# Altium PCB MainBoardPCB_PWR.PcbDoc (part 13 of 29)
Units mm, origin at the board's own origin, x right, y up, seen from the top; angles counter-clockwise.
Board outline 333.63 x 349.38 mm, 16 copper layers (L1, L2 (GND), L3 (Sign), L4 (GND), L5 (Sign), L6 (PWR/GND), L7(PWR/GND), L8 (PWR/GND), L9 (PWR/GND), L10 (PWR/GND), L11 (PWR/GND), L12 (Sign), L13 (GND), L14 (Sign), L15 (GND), L16), stack 2.503 mm thick; 2187 components, 1615 nets, 7987 pads, 1695 vias.
Unrouted connection lines stored in the file: 4757.
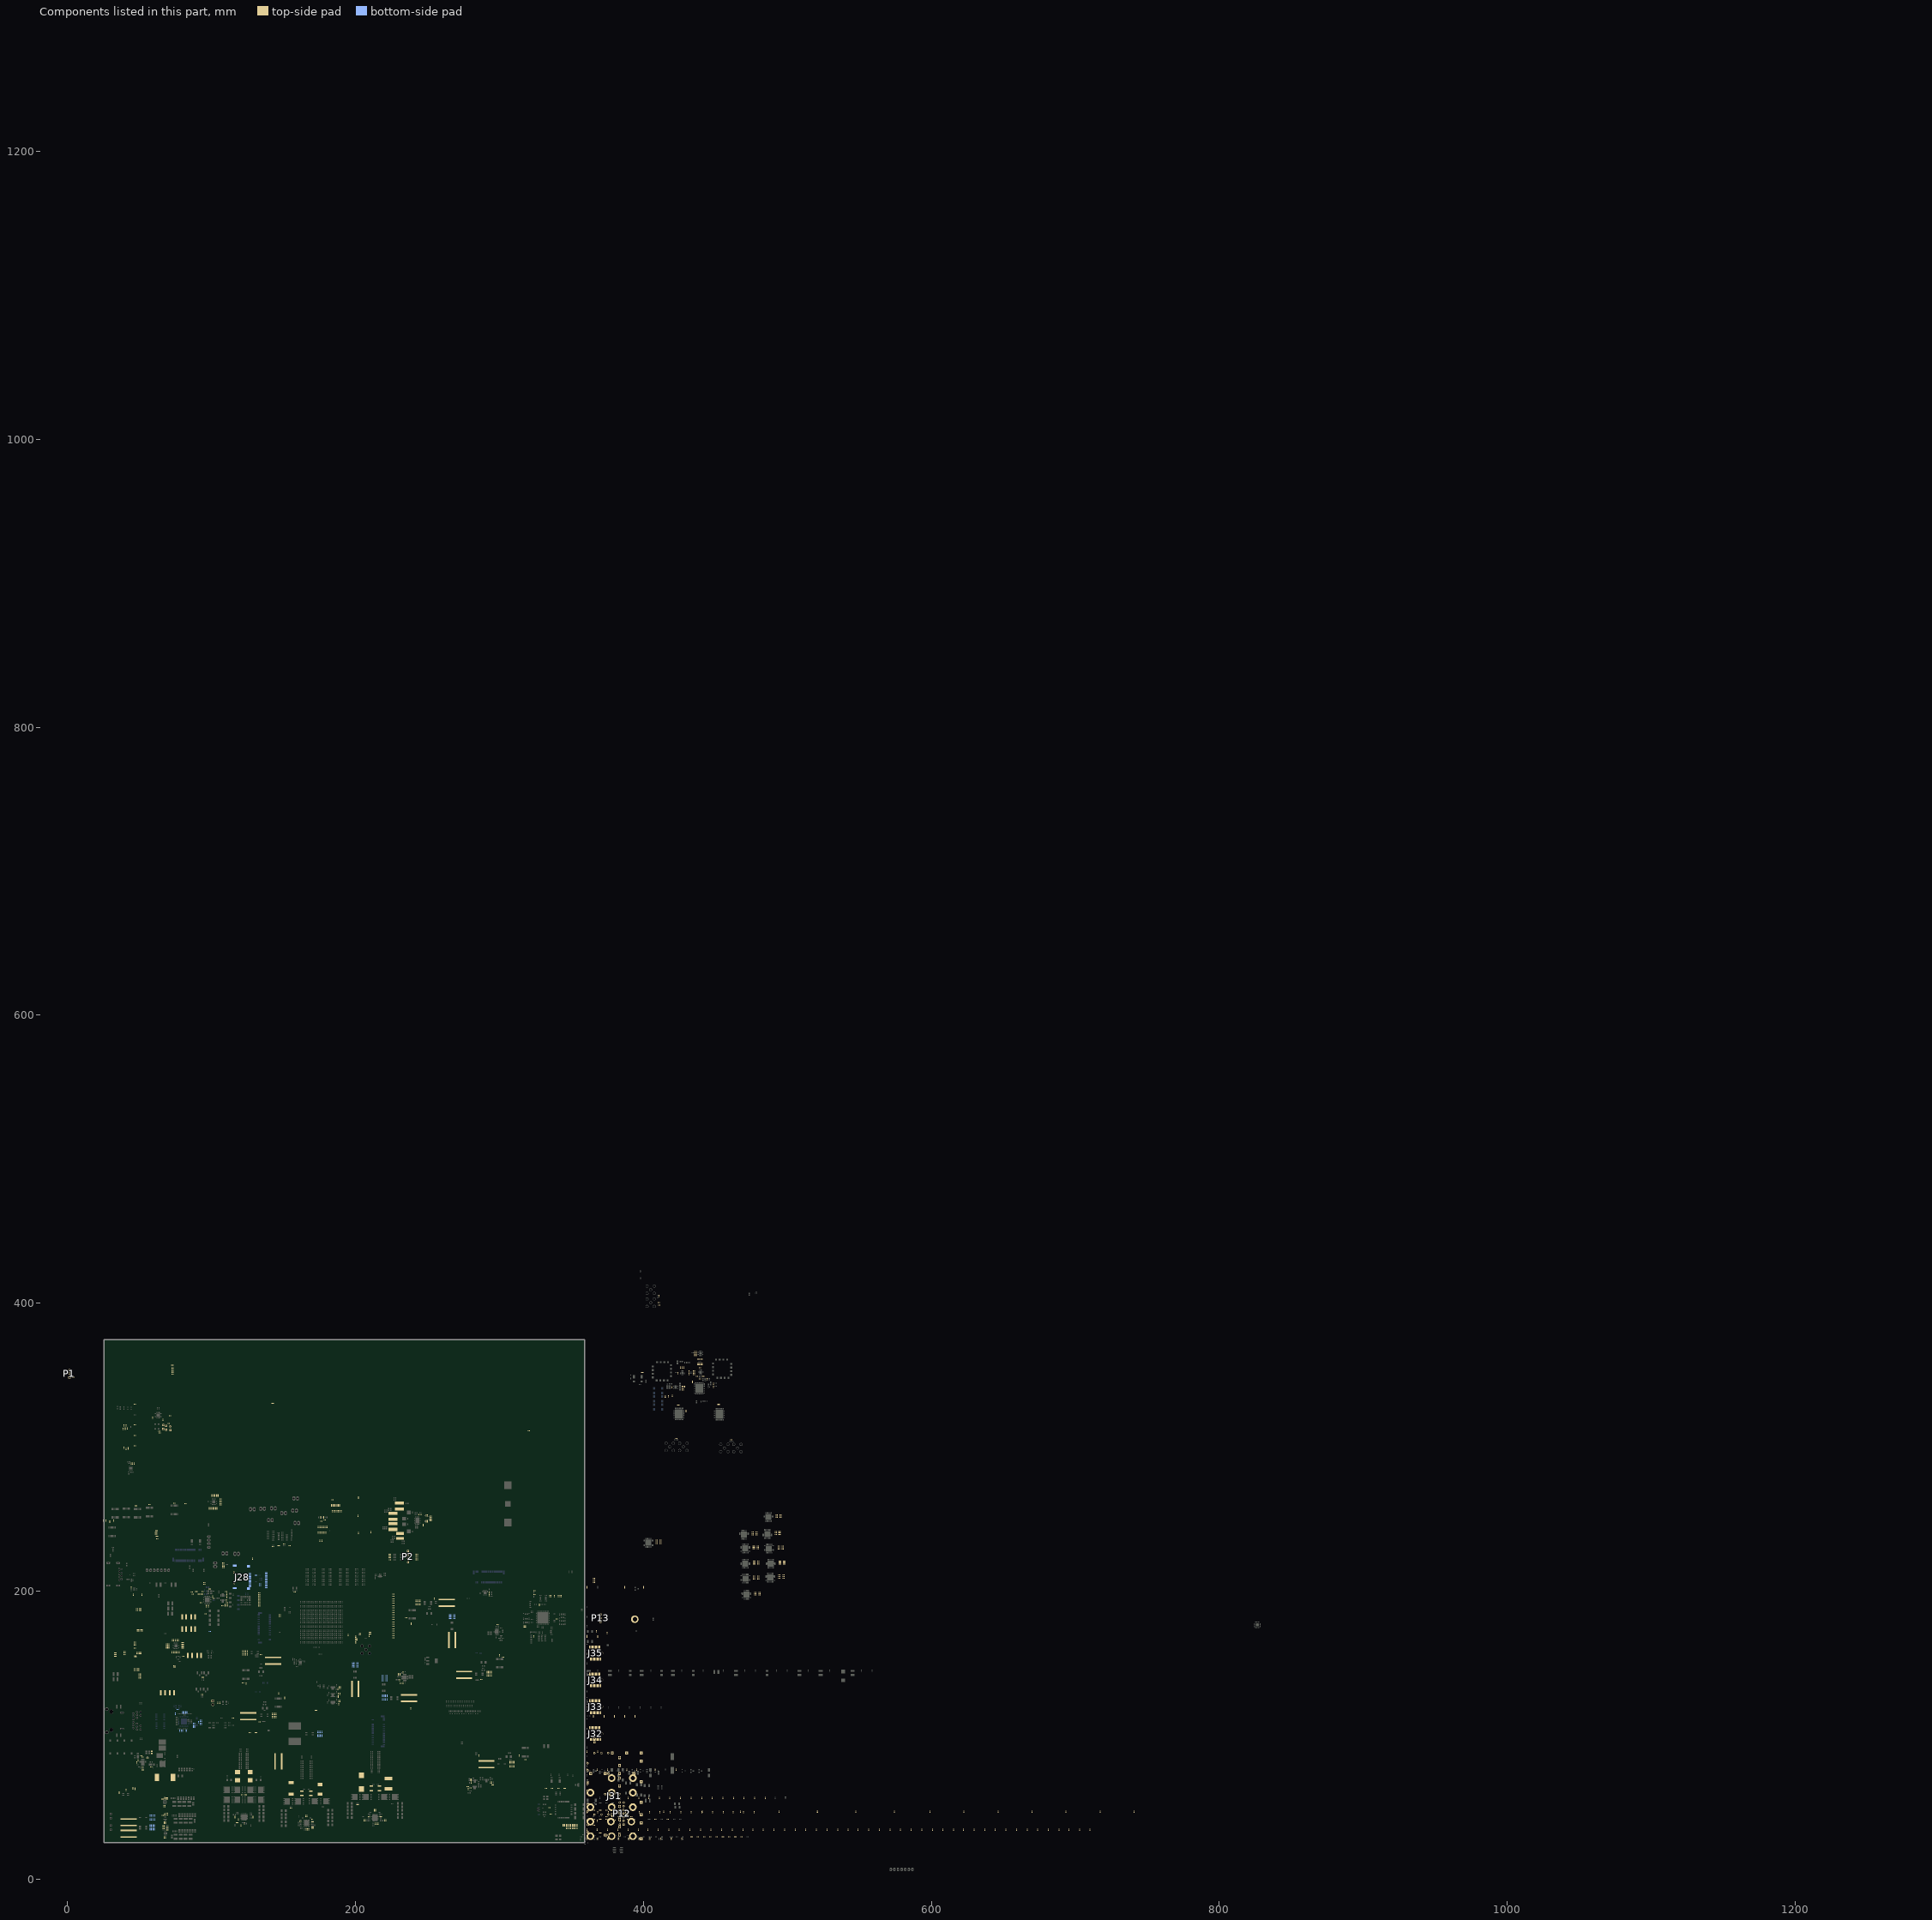
[diagram p15: the components of this part, seen from the top]

## Part data (continued)
J28: "WR-CRD Micro SD Card Connector Push & Push", Contact Resistance=100mOhm, Operating Temperature="-40 to +85degC", Rated Current=0.5A, Withstanding Voltage=500VAC, Working Voltage=30VAC, ComponentLink1Description=Manufacturer, ComponentLink1URL=http://www.we-online.de, ComponentLink2Description=Datasheet, ComponentLink2URL=https://katalog.we-online.com/em/datasheet/693071020811.pdf, Gender=Socket, Mounting Technology=SMT, Packaging="Tape and Reel", Part Number=693071020811, Pin Number=8, Published Date="November 2019", Publisher="Wurth Elektronik", Type="Push & Push"
J31: library part 2007132, Flammability Rating="UL94 V-0", Manufacturer="TE Connectivity", Manufacturer Part Number=2007132-1, Package Quantity=16, Supplier Part Number 1=A97939-ND, ComponentLink1Description=https://datasheet.ciiva.com/8074/1702641-8074723.pdf?src-supplier=Element14, ComponentLink1URL=https://datasheet.ciiva.com/8074/1702641-8074723.pdf?src-supplier=Element14, ComponentLink2Description=https://datasheet.ciiva.com/16354/2007132-1-16354359.pdf?src-supplier=Future+Electronics, ComponentLink2URL=https://datasheet.ciiva.com/16354/2007132-1-16354359.pdf?src-supplier=Future+Electronics, ComponentLink3Description=https://datasheet.ciiva.com/1447/1744756-1447853.pdf?src-supplier=Newark, ComponentLink3URL=https://datasheet.ciiva.com/1447/1744756-1447853.pdf?src-supplier=Newark, ComponentLink4Description=https://datasheet.ciiva.com/689/eng-cd-2007132-d1-pdf-2007132-c-drw-689518.pdf?src-supplier=Digi-Key, ComponentLink4URL=https://datasheet.ciiva.com/689/eng-cd-2007132-d1-pdf-2007132-c-drw-689518.pdf?src-supplier=Digi-Key, ComponentLink5Description=https://datasheet.ciiva.com/3093/eng-cs-1773408-1-pluggable-ixo-solutions-sfp2b-0209-3093041.pdf?src-supplier=Avnet, ComponentLink5URL=https://datasheet.ciiva.com/3093/eng-cs-1773408-1-pluggable-ixo-solutions-sfp2b-0209-3093041.pdf?src-supplier=Avnet, ComponentLink6Description=https://datasheet.ciiva.com/30089/o-solut-30089223.pdf?src-supplier=Onlinecomponents.com, ComponentLink6URL=https://datasheet.ciiva.com/30089/o-solut-30089223.pdf?src-supplier=Onlinecomponents.com, ComponentLink7Description=https://datasheet.ciiva.com/16775/eng-cs-1773408-1-pluggable-ixo-solutions-sfp2b-0209-16775672.pdf?src-supplier=Avnet+Europe, ComponentLink7URL=https://datasheet.ciiva.com/16775/eng-cs-1773408-1-pluggable-ixo-solutions-sfp2b-0209-16775672.pdf?src-supplier=Avnet+Europe, Connector Type=SFP, Data Rate=16Gbps, Depth=47.8mm, ELV=Compliant, Features=Shielded, Gender=Female, Housing Material=Silver, Lead Free="Not Applicable", Length=57.25mm, Material=Silver, Mount="Through Hole", Number of Ports=4, Orientation="Right Angle", Packaging=Tray, PCB Thickness=2.25mm, Pricing 1="1 = 12,92000, 10 = 11,74600, 25 = 11,45240, 50 = 10,57140, 100 = 9,98410, 250 = 9,10312, 500 = 8,51582, 1000 = 7,81106 (USD)", Radiation Hardening=No, REACH SVHC="No SVHC", RoHS=Yes, Stock 1=509, Supplier 1=Digi-Key, Tail Length=2.05mm, Termination=Press-Fit
J32 J33 J34 J35: "Conn zSFP+ F 20 POS 0.8mm Solder RA SMD 20 Terminal 1 Port zSFP+™ Reel", Current Rating=500mA, Flammability Rating="UL94 V-0", Housing Color=Black, Manufacturer=Molex, Max Operating Temperature=85°C, Max Voltage Rating (AC)=120V, Min Operating Temperature=-40°C, Package Quantity=960, Supplier Part Number 1=WM6178CT-ND, Category=Connectors, ComponentLink1Description=https://datasheet.ciiva.com/3966/317371703820001-io-nectors-3966818.pdf?src-supplier=Arrow, ComponentLink1URL=https://datasheet.ciiva.com/3966/317371703820001-io-nectors-3966818.pdf?src-supplier=Arrow, ComponentLink2Description=https://datasheet.ciiva.com/26288/495951703820001-io-nectors-26288395.pdf?src-supplier=Onlinecomponents.com, ComponentLink2URL=https://datasheet.ciiva.com/26288/495951703820001-io-nectors-26288395.pdf?src-supplier=Onlinecomponents.com, ComponentLink3Description=https://datasheet.ciiva.com/26945/getdatasheetpartid-750999-26945324.pdf?src-supplier=Verical, ComponentLink3URL=https://datasheet.ciiva.com/26945/getdatasheetpartid-750999-26945324.pdf?src-supplier=Verical, ComponentLink4Description=https://datasheet.ciiva.com/16077/629941703820001-io-nectors-16077135.pdf?src-supplier=Onlinecomponents.com, ComponentLink4URL=https://datasheet.ciiva.com/16077/629941703820001-io-nectors-16077135.pdf?src-supplier=Onlinecomponents.com, ComponentLink5Description=https://datasheet.ciiva.com/6929/1703820001-sd-6929267.pdf?src-supplier=Digi-Key, ComponentLink5URL=https://datasheet.ciiva.com/6929/1703820001-sd-6929267.pdf?src-supplier=Digi-Key, ComponentLink6Description=https://datasheet.ciiva.com/26915/getdatasheetpartid-410263-26915957.pdf?src-supplier=Verical, ComponentLink6URL=https://datasheet.ciiva.com/26915/getdatasheetpartid-410263-26915957.pdf?src-supplier=Verical, ComponentLink7Description=https://datasheet.ciiva.com/3138/1703820001-io-connectors-3138921.pdf?src-supplier=Avnet, ComponentLink7URL=https://datasheet.ciiva.com/3138/1703820001-io-connectors-3138921.pdf?src-supplier=Avnet, ComponentLink8Description=https://datasheet.ciiva.com/3138/1703820001-io-connectors-3138922.pdf?src-supplier=Avnet, ComponentLink8URL=https://datasheet.ciiva.com/3138/1703820001-io-connectors-3138922.pdf?src-supplier=Avnet, ComponentLink9Description=https://datasheet.ciiva.com/4569/1703820001-io-connectors-230609-4569597.pdf?src-supplier=Mouser, ComponentLink9URL=https://datasheet.ciiva.com/4569/1703820001-io-connectors-230609-4569597.pdf?src-supplier=Mouser, Connector Type=Receptacle, Contact Material="Bronze,Brass,Copper Alloy", Contact Plating=Gold, Depth=7.87mm, ELV=Compliant, Gender=Female, Halogen Free="Low Halogen", Housing Material=Polycarbonate, Length=11mm, Manufacturer Part Number=1703820001, Material=Brass, Max Voltage Rating (DC)=120V, Mount="Surface Mount", Number of Circuits=20, Number of Contacts=20, Number of Ports=1, Number of Positions=20, Number of Positions Loaded=20, Orientation="Right Angle", Packaging="Tape and Reel", Pitch=0.8mm, Pricing 1="1=2,23000, 10=2,02500, 25=1,90080, 50=1,81820, 100=1,73550 (USD)", Radiation Hardening=No, REACH SVHC="No SVHC", RoHS=Yes, Stock 1=248, Supplier 1=Digi-Key, Termination=Solder, Voltage Rating (AC)=120V
L1 L2 L3 L4 L5 L6 L7 L8: "Ind Power Shielded Wirewound 4.7uH 20% 100KHz Ferrite 1.7A Embossed T/R", Case/Package=Nonstandard, Current Rating=1.7A, DC Resistance (DCR)=84mR, Inductance=4.7uH, Manufacturer="Taiyo Yuden", Max Operating Temperature=125°C, Min Operating Temperature=-40°C, Package Quantity=3500, Ratings=AEC-Q200, Saturation Current=2A, Self Resonant Frequency=35MHz, Supplier Part Number 1=587-3578-1-ND, Test Frequency=100kHz, Tolerance=20%, Category="Fixed Inductors", ComponentLink1Description=https://datasheet.ciiva.com/29697/nrs4018t4r7mdgjv-ss-29697589.pdf?src-supplier=Digi-Key, ComponentLink1URL=https://datasheet.ciiva.com/29697/nrs4018t4r7mdgjv-ss-29697589.pdf?src-supplier=Digi-Key, Composition=Wirewound, Core Material=Ferrite, Depth=4mm, Halogen Free="Halogen Free", Height=1.8mm, Height - Seated (Max)=0.071inch, Length=4mm, Manufacturer Part Number=NRS4018T4R7MDGJV, Max DC Current=1.7A, Mount="Surface Mount", Packaging="Tape and Reel", Pricing 1="1=0,41000, 10=0,35700, 100=0,25500, 500=0,21422, 1000=0,17342 (USD)", Radiation Hardening=No, RoHS=Yes, Shielding=Shielded, Stock 1=1620, Supplier 1=Digi-Key, Termination=SMD/SMT, Weight=0.003527oz, Width=0.157inch
L9 L10: "220nH Shielded Molded Inductor 25A 1.9mOhm Max Nonstandard", Inductance=220nH@25A, Manufacturer 1=Laird, Supplier Part Number 1=240-3179-1-ND, ComponentLink1Description="Datasheet MGV0605 Series", ComponentLink1URL=https://assets.lairdtech.com/home/brandworld/files/MGV0605%20series%20approve%20sheet.pdf, Manufacturer Part Number 1=MGV0605R22M-10, Pricing 1="1=0,92000, 10=0,85800, 100=0,62020 (USD)", RoHS=No, Stock 1=1560, Supplier 1=Digi-Key
L11: "1.2µH Shielded Molded Inductor 17A 3.8mOhm Max Nonstandard", Inductance=1.2uH@17A, Manufacturer 1=Laird, Supplier Part Number 1=240-3187-1-ND, ComponentLink1Description="MGV1004 Series", ComponentLink1URL=https://assets.lairdtech.com/home/brandworld/files/MGV1004%20series%20approve%20sheet.pdf, Manufacturer Part Number 1=MGV10041R2M-10, Pricing 1="1=1,46000, 10=1,35700, 100=0,98140 (USD)", RoHS=No, Stock 1=1781, Supplier 1=Digi-Key
L12: "Wurth WE-LHMI Series Shielded Wire-wound SMD Inductor with a Iron Core, 0.68 µH Moulded 14A Idc", Case/Package=Nonstandard, Current Rating=14A, DC Resistance (DCR)=3.99mR, Inductance=680nH, Manufacturer 1="Wurth Electronics", Max Operating Temperature=125°C, Min Operating Temperature=-40°C, Saturation Current=32.5A, Self Resonant Frequency=53MHz, Supplier Part Number 1=732-7217-1-ND, Test Frequency=100kHz, Tolerance=20%, ComponentLink1Description=Datasheet, ComponentLink1URL=https://www.we-online.de/katalog/datasheet/744373560068.pdf, Composition=Wirewound, Core Material=Ferrite, Height - Seated (Max)=0.118inch, Length=0.362inch, Manufacturer Part Number 1=744373560068, Mount="Surface Mount", Packaging="Tape and Reel", Pricing 1="1=2,08000, 10=1,92800, 50=1,75300, 100=1,59400, 500=1,44900 (USD)", RoHS=Yes, Shielding=Shielded, Stock 1=995, Supplier 1=Digi-Key, Width=0.335inch
L13 L17: Inductance [µH]=8.2, Part Number=CDRH5D28NP-8R2, Supplier 2=Digi-Key, Supplier Part Number 2=308-2309-6-ND
L15: library part Inductor, Manufacturer=TDK, Manufacturer Part Number=MLZ1608N6R8LT000, Supplier Part Number 1=445-MLZ1608N6R8LT000CT-ND, Pricing 1="1 = 0,17000, 10 = 0,15500, 100 = 0,10350, 500 = 0,08626, 1000 = 0,07245 (USD)", Stock 1=3883, Supplier 1=Digi-Key
L16: Inductance="4.2 µH", Supplier Part Number 1=308-1802-1-ND, Supplier 1=Digi-Key
L18: "Fixed Inductors 3.3uH 1.57A 30% SMD LP INDUCTOR", Case/Package=Nonstandard, Current Rating=1.57A, DC Resistance (DCR)=49.2mR, Inductance=3.3uH, Manufacturer=Sumida, Max Operating Temperature=100°C, Min Operating Temperature=-40°C, Package Quantity=2000, Supplier Part Number 1=308-2184-1-ND, Test Frequency=100kHz, Tolerance=30%, ComponentLink1Description=http://www.mouser.com/ds/2/390/CDRH4D28-515415.pdf?src-supplier=Mouser, ComponentLink1URL=http://www.mouser.com/ds/2/390/CDRH4D28-515415.pdf?src-supplier=Mouser, ComponentLink2Description=http://www.sumida.com/products/pdf/CDRH4D28,CDRH4D28C,CDRH4D28CLD.pdf?src-supplier=Digi-Key, ComponentLink2URL=http://www.sumida.com/products/pdf/CDRH4D28,CDRH4D28C,CDRH4D28CLD.pdf?src-supplier=Digi-Key, ComponentLink3Description=http://www.sumida.com/products/pdf/CDRH4D28.pdf?src-supplier=Future+Electronics, ComponentLink3URL=http://www.sumida.com/products/pdf/CDRH4D28.pdf?src-supplier=Future+Electronics, ComponentLink4Description=http://products.sumida.com/products/pdf/CDRH4D28.pdf?src-supplier=Digi-Key, ComponentLink4URL=http://products.sumida.com/products/pdf/CDRH4D28.pdf?src-supplier=Digi-Key, ComponentLink5Description=http://www.sumida.com/products/pdf/CDRH4D28.pdf?src-supplier=Avnet, ComponentLink5URL=http://www.sumida.com/products/pdf/CDRH4D28.pdf?src-supplier=Avnet, Core Material=Ferrite, Depth=5mm, Height=3mm, Height - Seated (Max)=0.118inch, Lead Free="Lead Free", Length=0.185inch, Manufacturer Part Number=CDRH4D28NP-3R3NC, Max DC Current=1.57A, Mount="Surface Mount", Packaging="Tape and Reel", Pricing 1="1 = 0,93000, 10 = 0,86000, 100 = 0,62160, 500 = 0,47610, 1000 = 0,42320 (USD)", Radiation Hardening=No, RoHS=Yes, Shielding=Shielded, Stock 1=33311, Supplier 1=Digi-Key, Termination=SMD/SMT, Weight=0.007055oz, Width=0.197inch
L19: library part 7843330330, "WE-CHSA SMT High Current Inductor, size 1011, 3.3uH, 13.8A", DC Resistance max.=6.5mOhm, Inductance=3.3uH, Operating Temperature="-55 to +150degC", Rated Current=13.8A, Saturation Current=20.5A, Self Resonant Frequency=55MHz, ComponentLink1Description=Manufacturer, ComponentLink1URL=http://www.we-online.de, ComponentLink2Description=Datasheet, ComponentLink2URL=https://katalog.we-online.com/am/datasheet/7843330330.pdf, Mounting Technology=SMT, Packaging="Tape and Reel", Part Number=7843330330, Published Date="June 2019", Publisher="Wurth Elektronik", Size=1011
L20: library part 7443340150, "SMT High Current Cube Inductor WE-HCC, size 8070, 1.5 uH, 16.5 A", DC Resistance max.="5.6 mOhm", Inductance="1.5 uH", Operating Temperature="-40 to +125 degC", Rated Current="16.5 A", Saturation Current="18.5 A", Self Resonant Frequency="120 MHz", ComponentLink1Description=Manufacturer, ComponentLink1URL=http://www.we-online.de, ComponentLink2Description=Datasheet, ComponentLink2URL=https://katalog.we-online.com/pbs/datasheet/7443340150.pdf, Material=Ferrite, Mounting Technology=SMT, Packaging="Tape and Reel", Part Number=7443340150, Published Date="December 2018", Publisher="Wurth Elektronik", Size=8070
L22: "Inductor Power Shielded Wirewound 22uH 20% 100KHz 20Q-Factor Carbonyl Powder 9A 37mOhm DCR Automotive T/R", Case/Package=Nonstandard, Current Rating=9A, DC Resistance (DCR)=37mR, Inductance=22uH, Inductance Tolerance=20%, Manufacturer=Bourns, Max Operating Temperature=150°C, Min Operating Temperature=-40°C, Ratings=AEC-Q200, Saturation Current=12A, Self Resonant Frequency=6MHz, Supplier Part Number 1=SRP1265A-220MCT-ND, Test Frequency=100kHz, ComponentLink1Description=https://datasheet.ciiva.com/48685/srp1265a-48685099.pdf?src-supplier=Avnet, ComponentLink1URL=https://datasheet.ciiva.com/48685/srp1265a-48685099.pdf?src-supplier=Avnet, ComponentLink2Description=https://datasheet.ciiva.com/48685/srp1265a-48685101.pdf?src-supplier=Avnet, ComponentLink2URL=https://datasheet.ciiva.com/48685/srp1265a-48685101.pdf?src-supplier=Avnet, Composition=Wirewound, Core Material="Carbonyl Powder", DC Current=9A, Depth=12.8mm, Height=6.2mm, Height - Seated (Max)=0.252inch, Length=0.531inch, Manufacturer Part Number=SRP1265A-220M, Max DC Current=9A, Military Standard=Not, Mount="Surface Mount", Packaging="Cut Tape", Pricing 1="1 = 2,06000, 10 = 1,89800, 100 = 1,32830 (USD)", REACH SVHC="No SVHC", RMS Current (Irms)=9A, RoHS=Yes, Shielding=Shielded, Stock 1=17828, Supplier 1=Digi-Key, Termination=SMD/SMT, Tolerance=20%, Width=0.492inch
MP1_PCIE0 MP1_PCIE1 MP1_PCIE2 MP1_PCIE3 MP1_PCIE4 MP2_PCIE0 MP2_PCIE1 MP2_PCIE2 MP2_PCIE3 MP2_PCIE4 MP3_PCIE0 MP3_PCIE1 MP3_PCIE2 MP3_PCIE3 MP3_PCIE4: library part 9774025243R, "WA-SMSI SMT Steel Spacer, OD4.35mm, M2x2.5mm", Operating Temperature="-55 to +150degC", ComponentLink1Description=Manufacturer, ComponentLink1URL=http://www.we-online.de, ComponentLink2Description=Datasheet, ComponentLink2URL=https://katalog.we-online.com/em/datasheet/9774025243R.pdf, Inner Diameter=2.8mm, Inner Thread Length=-, Length=2.5mm, Material=Steel, Mounting Technology=SMT, Outer Diameter=4.35mm, Packaging="Tape and Reel", Part Number=9774025243R, Published Date="September 2019", Publisher="Wurth Elektronik", Surface=Tin, Thread=M2
P1 P13: "Header, 3-Pin", LatestRevisionDate=17-Jul-2002, LatestRevisionNote="Re-released for DXP Platform.", Publisher="Altium Limited"
P2: "Header, 4-Pin", LatestRevisionDate=17-Jul-2002, LatestRevisionNote="Re-released for DXP Platform.", Publisher="Altium Limited"
P3 P4 P5 P11: "Header, 2-Pin", LatestRevisionDate=17-Jul-2002, LatestRevisionNote="Re-released for DXP Platform.", Publisher="Altium Limited"
P6: "Male Header, Pitch 2.54 mm, 1 x 2 Position, Height 10.49 mm, Tail Length 3.556 mm, -55 to 105 degC, RoHS, Bulk", Color=White, Current, Rating="5  A", Flammability Rating=UL94V-0, Supplier Part Number 1=A1921-ND, Temperature, Operating="-55 to +105  °C", Voltage, Rating="250  V", Agency Approvals="CSA, UL", Angle=Straight, Brand/Series="MTA-100 Series", Color, Housing=White, ComponentLink1Description="Manufacturer URL", ComponentLink1URL=http://www.te.com, ComponentLink2Description=Datasheet, ComponentLink2URL=https://datasheet.ciiva.com/11746/0900766b80eb7fdd-11746365.pdf, Connector Type=MTA-100, Contact Centerline Spacing="0.100  in.", Contact Mating Area Plating=Tin, Contact Plating=Tin, Contact Shape=Square, Contact Termination Area Plating=Tin, DatasheetVersion="Rev. W", Length, Overall="0.2  \"", Length, Pin="0.14  \"", Length, Terminal Post="0.14  in.", Material, Contact="Copper Alloy", Material, Housing=Polyester, Mount Angle=Vertical, Mounting Hole Size="0.04  \"", Mounting Type="PC Mount", Number of Contacts=2, Number of Positions=2, Number of Rows=1, PackageDescription="HDR, 2-Leads, Body 5.715x5.08mm, Pitch 2.54mm", PackageReference=THD, Pin Spacing="0.1  \"", Primary Type="Interconnect System", Size, Post="0.025  in.", Special Features=Pinstrip, Standards="RoHS Compliant, ELV Compliant, UL 94V-0", Supplier 1=Digi-Key, Termination=Solder, Type="PCB Plug"
P12: "Header, 7-Pin, Dual row", LatestRevisionDate=17-Jul-2002, LatestRevisionNote="Re-released for DXP Platform.", Publisher="Altium Limited"
R1 R2 R71 R72 R73 R74 R91 R92 R93 R94 R127 R139 R141 R142 R143 R144 R151 R152 R153 R154 R161 R162 R163 R164 R345 R376 R377 R378 R402 R403 R404 R405 R406 R407 R408 R409 R411 R412 R413 R414 R415 R416 R418 R421 R481 R498 R540 R636 R637 R638 R639 R640 R641 R642 R643 R692 R722 R723 R724 R725 R726 R727 R728 R729: library part Resistor, "SMT Resistor", Case Code (Imperial)=0402, Case Code (Metric)=1005, Manufacturer=Vishay, Manufacturer Part Number=CRCW04020000Z0ED, Max Operating Temperature=155°C, Max Power Dissipation=63mW, Min Operating Temperature=-55°C, Package Quantity=1, Resistance=0mR, Supplier Part Number 1=541-0.0JCT-ND, Temperature Coefficient=100ppm/°C, Tolerance=5%, Voltage Rating=50V, Case/Package=0402, ComponentLink1Description=https://datasheet.ciiva.com/16881/dcrcwe3-16881413.pdf?src-supplier=Avnet+Europe, ComponentLink1URL=https://datasheet.ciiva.com/16881/dcrcwe3-16881413.pdf?src-supplier=Avnet+Europe, ComponentLink2Description=https://datasheet.ciiva.com/2461/dcrcwe3-2461964.pdf?src-supplier=Digi-Key, ComponentLink2URL=https://datasheet.ciiva.com/2461/dcrcwe3-2461964.pdf?src-supplier=Digi-Key, ComponentLink3Description=https://datasheet.ciiva.com/7841/1697337-7841468.pdf?src-supplier=Element14, ComponentLink3URL=https://datasheet.ciiva.com/7841/1697337-7841468.pdf?src-supplier=Element14, ComponentLink4Description=https://datasheet.ciiva.com/3255/dcrcwe3-3255944.pdf?src-supplier=Avnet, ComponentLink4URL=https://datasheet.ciiva.com/3255/dcrcwe3-3255944.pdf?src-supplier=Avnet, ComponentLink5Description=https://datasheet.ciiva.com/3255/dcrcwe3-3255945.pdf?src-supplier=Avnet, ComponentLink5URL=https://datasheet.ciiva.com/3255/dcrcwe3-3255945.pdf?src-supplier=Avnet, ComponentLink6Description=https://datasheet.ciiva.com/2461/dcrcwe3-2461962.pdf?src-supplier=Digi-Key, ComponentLink6URL=https://datasheet.ciiva.com/2461/dcrcwe3-2461962.pdf?src-supplier=Digi-Key, ComponentLink7Description=https://datasheet.ciiva.com/7841/1720486-7841802.pdf?src-supplier=Element14, ComponentLink7URL=https://datasheet.ciiva.com/7841/1720486-7841802.pdf?src-supplier=Element14, ComponentLink8Description=https://datasheet.ciiva.com/2461/dcrcwe3-2461963.pdf?src-supplier=Digi-Key, ComponentLink8URL=https://datasheet.ciiva.com/2461/dcrcwe3-2461963.pdf?src-supplier=Digi-Key, ComponentLink9Description=https://datasheet.ciiva.com/16761/70200976-16761309.pdf?src-supplier=Allied+Electronics, ComponentLink9URL=https://datasheet.ciiva.com/16761/70200976-16761309.pdf?src-supplier=Allied+Electronics, ComponentLink10Description=https://datasheet.ciiva.com/26311/fld-crcw-e3-data-en-26311550.pdf?src-supplier=Distrelec, ComponentLink10URL=https://datasheet.ciiva.com/26311/fld-crcw-e3-data-en-26311550.pdf?src-supplier=Distrelec, Composition="Thick Film", Contact Plating=Tin, Depth=0.5mm, Features="Automotive AEC-Q200", Height=0.35mm, Lead Free="Lead Free", Length=1mm, Military Standard=Not, Mount="Surface Mount", Number of Terminations=2, Packaging="Tape and Reel", Power Rating=63mW, Pricing 1="1 = 0,10000, 10 = 0,03400, 25 = 0,02440, 50 = 0,01860, 100 = 0,01380, 250 = 0,01048, 500 = 0,00840, 1000 = 0,00618, 5000 = 0,00443 (USD)", Radiation Hardening=No, REACH SVHC=Unknown, RoHS=Yes, Stock 1=1906658, Supplier 1=Digi-Key, Termination=SMD/SMT, Voltage Rating (DC)=50V, Weight=2.3E-05oz, Width=0.5mm
R3_I2C_Bridge R3_I2C_Bridge_2 R3_I2C_Bridge_3 R4_I2C_Bridge R4_I2C_Bridge_2 R4_I2C_Bridge_3 R5_I2C_Bridge R5_I2C_Bridge_2 R5_I2C_Bridge_3 R6_I2C_Bridge R6_I2C_Bridge_2 R6_I2C_Bridge_3 R7_I2C_Bridge R7_I2C_Bridge_2 R7_I2C_Bridge_3 R8_I2C_Bridge R8_I2C_Bridge_2 R8_I2C_Bridge_3 R9_I2C_Bridge R9_I2C_Bridge_2 R9_I2C_Bridge_3 R10_I2C_Bridge R10_I2C_Bridge_2 R10_I2C_Bridge_3 R106 R109 R124 R223_I2C_Bridge R223_I2C_Bridge_2 R223_I2C_Bridge_3 R224_I2C_Bridge R224_I2C_Bridge_2 R224_I2C_Bridge_3 R225_I2C_Bridge R225_I2C_Bridge_2 R225_I2C_Bridge_3 R226_I2C_Bridge R226_I2C_Bridge_2 R226_I2C_Bridge_3 R227_I2C_Bridge R227_I2C_Bridge_2 R227_I2C_Bridge_3 R231_SPI_bridge2 R232_SPI_bridge1 R232_SPI_bridge2 R232_SPI_bridge3 R233_SPI_bridge2 R234_SPI_bridge1 R234_SPI_bridge2 R234_SPI_bridge3 R235_SPI_bridge1 R235_SPI_bridge2 R235_SPI_bridge3 R236_SPI_bridge2 R237_SPI_bridge1 R237_SPI_bridge2 R237_SPI_bridge3 R238_SPI_bridge2 R239_SPI_bridge1 R239_SPI_bridge2 R239_SPI_bridge3 R240_SPI_bridge2 R424 R428 R488 R499 R544 R558_I2C_Bridge R558_I2C_Bridge_2 R558_I2C_Bridge_3 R559_I2C_Bridge R559_I2C_Bridge_2 R559_I2C_Bridge_3 R560_I2C_Bridge R560_I2C_Bridge_2 R560_I2C_Bridge_3 R599 R694: library part Resistor, Case Code (Imperial)=0402, Case Code (Metric)=1005, Manufacturer=Panasonic, Manufacturer Part Number=ERJ-2RKF1001X, Max Operating Temperature=155°C, Max Power Dissipation=100mW, Min Operating Temperature=-55°C, Package Quantity=1, Supplier Part Number 1=P1.00KLCT-ND, Temperature Coefficient=100ppm/°C, Tolerance=1%, Voltage Rating=50V, Case/Package=0402, ComponentLink1Description=https://datasheet.ciiva.com/11821/0900766b80f80784-11821203.pdf?src-supplier=RSComponents, ComponentLink1URL=https://datasheet.ciiva.com/11821/0900766b80f80784-11821203.pdf?src-supplier=RSComponents, Composition="Thick Film", Contact Plating=Tin, Depth=0.5mm, Features="Automotive AEC-Q200", Height=0.35mm, Lead Free="Lead Free", Length=1mm, Military Standard=Not, Mount="Surface Mount", Number of Pins=2, Number of Terminations=2, Packaging="Tape and Reel", Power Rating=100mW, Radiation Hardening=No, REACH SVHC="No SVHC", Resistance=1kR, RoHS=Yes, Supplier 1=Digi-Key, Termination=SMD/SMT, Voltage Rating (DC)=50V, Width=0.5mm, Working Voltage=50V
  R3_I2C_Bridge R3_I2C_Bridge_2 R3_I2C_Bridge_3 R4_I2C_Bridge R4_I2C_Bridge_2 R4_I2C_Bridge_3 R5_I2C_Bridge R5_I2C_Bridge_2 R5_I2C_Bridge_3 R6_I2C_Bridge R6_I2C_Bridge_2 R6_I2C_Bridge_3 R7_I2C_Bridge R7_I2C_Bridge_2 R7_I2C_Bridge_3 R8_I2C_Bridge R8_I2C_Bridge_2 R8_I2C_Bridge_3 R9_I2C_Bridge R9_I2C_Bridge_2 R9_I2C_Bridge_3 R10_I2C_Bridge R10_I2C_Bridge_2 R10_I2C_Bridge_3 R106 R109 R124 R223_I2C_Bridge R223_I2C_Bridge_2 R223_I2C_Bridge_3 R224_I2C_Bridge R224_I2C_Bridge_2 R224_I2C_Bridge_3 R225_I2C_Bridge R225_I2C_Bridge_2 R225_I2C_Bridge_3 R226_I2C_Bridge R226_I2C_Bridge_2 R226_I2C_Bridge_3 R227_I2C_Bridge R227_I2C_Bridge_2 R227_I2C_Bridge_3 R231_SPI_bridge2 R232_SPI_bridge1 R232_SPI_bridge2 R232_SPI_bridge3 R233_SPI_bridge2 R234_SPI_bridge1 R234_SPI_bridge2 R234_SPI_bridge3 R235_SPI_bridge1 R235_SPI_bridge2 R235_SPI_bridge3 R236_SPI_bridge2 R237_SPI_bridge1 R237_SPI_bridge2 R237_SPI_bridge3 R238_SPI_bridge2 R239_SPI_bridge1 R239_SPI_bridge2 R239_SPI_bridge3 R240_SPI_bridge2 R424 R428 R499 R544 R558_I2C_Bridge R558_I2C_Bridge_2 R558_I2C_Bridge_3 R559_I2C_Bridge R559_I2C_Bridge_2 R559_I2C_Bridge_3 R560_I2C_Bridge R560_I2C_Bridge_2 R560_I2C_Bridge_3 R599 R694: ComponentLink2Description=https://datasheet.ciiva.com/16767/70260748-16767559.pdf?src-supplier=Allied+Electronics, ComponentLink2URL=https://datasheet.ciiva.com/16767/70260748-16767559.pdf?src-supplier=Allied+Electronics, ComponentLink3Description=https://datasheet.ciiva.com/9198/aoa0000ce2-9198920.pdf?src-supplier=Avnet, ComponentLink3URL=https://datasheet.ciiva.com/9198/aoa0000ce2-9198920.pdf?src-supplier=Avnet, ComponentLink4Description=https://datasheet.ciiva.com/7942/aoa0000ce2-7942426.pdf?src-supplier=Element14, ComponentLink4URL=https://datasheet.ciiva.com/7942/aoa0000ce2-7942426.pdf?src-supplier=Element14, ComponentLink5Description=https://datasheet.ciiva.com/16771/70260748-16771979.pdf?src-supplier=Allied+Electronics, ComponentLink5URL=https://datasheet.ciiva.com/16771/70260748-16771979.pdf?src-supplier=Allied+Electronics, ComponentLink6Description=https://datasheet.ciiva.com/17215/aoa0000ce2-17215308.pdf?src-supplier=Avnet+Europe, ComponentLink6URL=https://datasheet.ciiva.com/17215/aoa0000ce2-17215308.pdf?src-supplier=Avnet+Europe, ComponentLink7Description=https://datasheet.ciiva.com/28532/1678782-28532109.pdf?src-supplier=Element14, ComponentLink7URL=https://datasheet.ciiva.com/28532/1678782-28532109.pdf?src-supplier=Element14, ComponentLink8Description=https://datasheet.ciiva.com/16523/aoa0000ce2-16523834.pdf?src-supplier=Avnet+Asia, ComponentLink8URL=https://datasheet.ciiva.com/16523/aoa0000ce2-16523834.pdf?src-supplier=Avnet+Asia, ComponentLink9Description=https://datasheet.ciiva.com/22673/1678782-22673916.pdf?src-supplier=Element14, ComponentLink9URL=https://datasheet.ciiva.com/22673/1678782-22673916.pdf?src-supplier=Element14, Pricing 1="1 = 0,10000, 10 = 0,05200, 100 = 0,02130, 1000 = 0,00958, 2500 = 0,00832, 5000 = 0,00687 (USD)", Stock 1=6683975
  R488: ComponentLink2Description=https://datasheet.ciiva.com/7942/aoa0000ce2-7942426.pdf?src-supplier=Element14, ComponentLink2URL=https://datasheet.ciiva.com/7942/aoa0000ce2-7942426.pdf?src-supplier=Element14, ComponentLink3Description=https://datasheet.ciiva.com/16523/aoa0000ce2-16523834.pdf?src-supplier=Avnet+Asia, ComponentLink3URL=https://datasheet.ciiva.com/16523/aoa0000ce2-16523834.pdf?src-supplier=Avnet+Asia, ComponentLink4Description=https://datasheet.ciiva.com/17215/aoa0000ce2-17215308.pdf?src-supplier=Avnet+Europe, ComponentLink4URL=https://datasheet.ciiva.com/17215/aoa0000ce2-17215308.pdf?src-supplier=Avnet+Europe, ComponentLink5Description=https://datasheet.ciiva.com/22673/1678782-22673916.pdf?src-supplier=Element14, ComponentLink5URL=https://datasheet.ciiva.com/22673/1678782-22673916.pdf?src-supplier=Element14, ComponentLink6Description=https://datasheet.ciiva.com/28532/1678782-28532109.pdf?src-supplier=Element14, ComponentLink6URL=https://datasheet.ciiva.com/28532/1678782-28532109.pdf?src-supplier=Element14, ComponentLink7Description=https://datasheet.ciiva.com/16767/70260748-16767559.pdf?src-supplier=Allied+Electronics, ComponentLink7URL=https://datasheet.ciiva.com/16767/70260748-16767559.pdf?src-supplier=Allied+Electronics, ComponentLink8Description=https://datasheet.ciiva.com/9198/aoa0000ce2-9198920.pdf?src-supplier=Avnet, ComponentLink8URL=https://datasheet.ciiva.com/9198/aoa0000ce2-9198920.pdf?src-supplier=Avnet, ComponentLink9Description=https://datasheet.ciiva.com/16771/70260748-16771979.pdf?src-supplier=Allied+Electronics, ComponentLink9URL=https://datasheet.ciiva.com/16771/70260748-16771979.pdf?src-supplier=Allied+Electronics, Pricing 1="1 = 0,10000, 10 = 0,04800, 100 = 0,01940, 1000 = 0,00873, 2500 = 0,00758, 5000 = 0,00626 (USD)", Stock 1=5960470
R11 R13 R29 R30 R214 R218 R630: library part Resistor, Case/Package=0402, Case Code (Metric)=1005, Manufacturer 1=Yageo, Manufacturer Part Number 1=RC0402FR-0710KL, Max Operating Temperature=155°C, Min Operating Temperature=-55°C, Power Rating=62.5mW, Supplier Part Number 1=311-10.0KLRCT-ND, Temperature Coefficient=100ppm/°C, Tolerance=1%, Voltage Rating=50V, Case Code (Imperial)=0402, ComponentLink1Description=https://datasheet.ciiva.com/7660/38568-7660787.pdf?src-supplier=Element14, ComponentLink1URL=https://datasheet.ciiva.com/7660/38568-7660787.pdf?src-supplier=Element14, ComponentLink2Description=https://datasheet.ciiva.com/7849/1784430-7849813.pdf?src-supplier=Element14, ComponentLink2URL=https://datasheet.ciiva.com/7849/1784430-7849813.pdf?src-supplier=Element14, ComponentLink3Description=https://datasheet.ciiva.com/7849/1686128-7849814.pdf?src-supplier=Element14, ComponentLink3URL=https://datasheet.ciiva.com/7849/1686128-7849814.pdf?src-supplier=Element14, ComponentLink4Description=https://datasheet.ciiva.com/7849/1784430-7849815.pdf?src-supplier=Element14, ComponentLink4URL=https://datasheet.ciiva.com/7849/1784430-7849815.pdf?src-supplier=Element14, ComponentLink5Description=https://datasheet.ciiva.com/22747/1018594-22747512.pdf?src-supplier=Element14, ComponentLink5URL=https://datasheet.ciiva.com/22747/1018594-22747512.pdf?src-supplier=Element14, ComponentLink6Description=https://datasheet.ciiva.com/12667/pyu-rc0402-51-rohs-l-6-r-12667067.pdf?src-supplier=Mouser, ComponentLink6URL=https://datasheet.ciiva.com/12667/pyu-rc0402-51-rohs-l-6-r-12667067.pdf?src-supplier=Mouser, ComponentLink7Description=https://datasheet.ciiva.com/7983/1018594-7983486.pdf?src-supplier=Element14, ComponentLink7URL=https://datasheet.ciiva.com/7983/1018594-7983486.pdf?src-supplier=Element14, Composition="Thick Film", Depth=0.5mm, Height=0.32mm, Lead Free="Lead Free", Lead Pitch=0.2mm, Length=1mm, Military Standard=Not, Number of Pins=2, Number of Terminations=2, Packaging="Tape and Reel", Pricing 1="1=0,10000, 10=0,01500, 100=0,00600, 1000=0,00270, 2500=0,00235, 5000=0,00194 (USD)", REACH SVHC="No SVHC", Resistance=10kR, RoHS=Yes, Stock 1=71214322, Supplier 1=Digi-Key, Termination=SMD/SMT, Voltage Rating (DC)=50V, Width=0.5mm, Working Voltage=50V
R12 R15 R17 R20 R677 R678 R679 R680: library part Resistor, Case/Package=0402, Case Code (Metric)=1005, Manufacturer 1=Yageo, Manufacturer Part Number 1=RC0402FR-0795K3L, Max Operating Temperature=155°C, Max Power Dissipation=63mW, Min Operating Temperature=-55°C, Package Quantity=1, Power Rating=62.5mW, Supplier Part Number 1=311-95.3KLRCT-ND, Temperature Coefficient=100ppm/°C, Tolerance=1%, Voltage Rating=50V, Case Code (Imperial)=0402, ComponentLink1Description=https://datasheet.ciiva.com/2453/pyu-r-int-thick-7-2453484.pdf?src-supplier=Digi-Key, ComponentLink1URL=https://datasheet.ciiva.com/2453/pyu-r-int-thick-7-2453484.pdf?src-supplier=Digi-Key, ComponentLink2Description=https://datasheet.ciiva.com/28395/pyu-rc0402-51-rohs-l-6-28395740.pdf?src-supplier=Avnet+Europe, ComponentLink2URL=https://datasheet.ciiva.com/28395/pyu-rc0402-51-rohs-l-6-28395740.pdf?src-supplier=Avnet+Europe, ComponentLink3Description=https://datasheet.ciiva.com/2453/pyu-r-int-thick-7-2453485.pdf?src-supplier=Digi-Key, ComponentLink3URL=https://datasheet.ciiva.com/2453/pyu-r-int-thick-7-2453485.pdf?src-supplier=Digi-Key, ComponentLink4Description=https://datasheet.ciiva.com/2453/pyu-r-int-thick-7-2453486.pdf?src-supplier=Digi-Key, ComponentLink4URL=https://datasheet.ciiva.com/2453/pyu-r-int-thick-7-2453486.pdf?src-supplier=Digi-Key, ComponentLink5Description=https://datasheet.ciiva.com/16746/pyu-rc0402-51-rohs-l-6-r-16746015.pdf?src-supplier=Future+Electronics, ComponentLink5URL=https://datasheet.ciiva.com/16746/pyu-rc0402-51-rohs-l-6-r-16746015.pdf?src-supplier=Future+Electronics, Composition="Thick Film", Contact Plating=Tin,Matte, Depth=0.5mm, Features="Moisture Resistant", Height=0.016inch, Lead Free="Lead Free", Length=0.039inch, Military Standard=Not, Number of Terminations=2, Packaging="Tape and Reel", Pricing 1="1=0,10000, 10=0,01600, 100=0,00640, 1000=0,00289, 2500=0,00251, 5000=0,00207 (USD)", Resistance=95.3kR, RoHS=Yes, Stock 1=128730, Supplier 1=Digi-Key, Termination=SMD/SMT, Voltage Rating (DC)=50V, Width=0.02inch
R14 R16 R22 R24 R304 R388 R389 R390 R665 R669 R670: library part Resistor, Case/Package=0402, Case Code (Metric)=1005, Manufacturer 1=Yageo, Manufacturer Part Number 1=RC0402JR-070RL, Max Operating Temperature=155°C, Max Power Dissipation=63mW, Min Operating Temperature=-55°C, Package Quantity=1, Power Rating=62.5mW, Supplier Part Number 1=311-0.0JRCT-ND, Temperature Coefficient=200ppm/°C, Tolerance=5%, Voltage Rating=50V, Case Code (Imperial)=0402, ComponentLink1Description=https://datasheet.ciiva.com/2452/pyu-rc0402-51-rohs-l-6-2452608.pdf?src-supplier=Digi-Key, ComponentLink1URL=https://datasheet.ciiva.com/2452/pyu-rc0402-51-rohs-l-6-2452608.pdf?src-supplier=Digi-Key, ComponentLink2Description=https://datasheet.ciiva.com/11808/0900766b80c66297-11808195.pdf?src-supplier=RSComponents, ComponentLink2URL=https://datasheet.ciiva.com/11808/0900766b80c66297-11808195.pdf?src-supplier=RSComponents, ComponentLink3Description=https://datasheet.ciiva.com/2452/pyu-r-int-thick-7-2452609.pdf?src-supplier=Digi-Key, ComponentLink3URL=https://datasheet.ciiva.com/2452/pyu-r-int-thick-7-2452609.pdf?src-supplier=Digi-Key, ComponentLink4Description=https://datasheet.ciiva.com/22747/1018594-22747515.pdf?src-supplier=Element14, ComponentLink4URL=https://datasheet.ciiva.com/22747/1018594-22747515.pdf?src-supplier=Element14, ComponentLink5Description=https://datasheet.ciiva.com/7983/1018594-7983535.pdf?src-supplier=Element14, ComponentLink5URL=https://datasheet.ciiva.com/7983/1018594-7983535.pdf?src-supplier=Element14, ComponentLink6Description=https://datasheet.ciiva.com/2452/pyu-r-int-thick-7-2452610.pdf?src-supplier=Digi-Key, ComponentLink6URL=https://datasheet.ciiva.com/2452/pyu-r-int-thick-7-2452610.pdf?src-supplier=Digi-Key, ComponentLink7Description=https://datasheet.ciiva.com/8896/pyu-rc0402-51-rohs-l-6-8896201.pdf?src-supplier=Avnet, ComponentLink7URL=https://datasheet.ciiva.com/8896/pyu-rc0402-51-rohs-l-6-8896201.pdf?src-supplier=Avnet, ComponentLink8Description=https://datasheet.ciiva.com/28386/pyu-rc0402-51-rohs-l-6-28386633.pdf?src-supplier=Avnet+Europe, ComponentLink8URL=https://datasheet.ciiva.com/28386/pyu-rc0402-51-rohs-l-6-28386633.pdf?src-supplier=Avnet+Europe, ComponentLink9Description=https://datasheet.ciiva.com/15189/getdatasheetpartid-326379-15189533.pdf?src-supplier=Verical, ComponentLink9URL=https://datasheet.ciiva.com/15189/getdatasheetpartid-326379-15189533.pdf?src-supplier=Verical, Composition="Thick Film", Contact Plating=Tin,Matte, Depth=0.5mm, Features="Moisture Resistant", Height=0.016inch, Lead Free="Lead Free", Length=1mm, Military Standard=Not, Number of Terminations=2, Packaging="Tape and Reel", Pricing 1="1=0.10000, 10=0.01200, 25=0.00920, 50=0.00680, 100=0.00510, 250=0.00388, 500=0.00308, 1000=0.00227, 5000=0.00163 (USD)", Radiation Hardening=No, REACH SVHC=Unknown, Resistance=0mR, RoHS=Yes, Stock 1=69822252, Supplier 1=Digi-Key, Termination=SMD/SMT, Width=0.02inch
R18 R21 R681: library part Resistor, Case/Package=0402, Case Code (Metric)=1005, Manufacturer="Stackpole Electronics", Manufacturer Part Number=RMCF0402FT24K9, Max Operating Temperature=155°C, Max Power Dissipation=63mW, Min Operating Temperature=-55°C, Supplier Part Number 1=RMCF0402FT24K9CT-ND, Temperature Coefficient=100ppm/°C, Tolerance=1%, Case Code (Imperial)=0402, ComponentLink1Description=http://components.arrow.com/part/dataview/47783131S7785444N1174?src-supplier=Arrow, ComponentLink1URL=http://components.arrow.com/part/dataview/47783131S7785444N1174?src-supplier=Arrow, ComponentLink2Description=https://www.seielect.com/catalog/SEI-Packaging.pdf?src-supplier=Digi-Key, ComponentLink2URL=https://www.seielect.com/catalog/SEI-Packaging.pdf?src-supplier=Digi-Key, ComponentLink3Description=https://www.seielect.com/catalog/SEI-RMCF_RMCP.pdf?src-supplier=Avnet, ComponentLink3URL=https://www.seielect.com/catalog/SEI-RMCF_RMCP.pdf?src-supplier=Avnet, ComponentLink4Description=http://www.seielect.com/Catalog/SEI-RMC.pdf?src-supplier=Future+Electronics, ComponentLink4URL=http://www.seielect.com/Catalog/SEI-RMC.pdf?src-supplier=Future+Electronics, Composition="Thick Film", Contact Plating=Tin,Matte, Features="Automotive AEC-Q200", Height=0.016inch, Lead Free="Lead Free", Length=0.039inch, Mount="Surface Mount", Number of Terminations=2, Packaging="Tape and Reel", Power Rating=63mW, Pricing 1="1 = 0,10000, 10 = 0,01400, 100 = 0,00580, 1000 = 0,00262, 2500 = 0,00228, 5000 = 0,00188 (USD)", Radiation Hardening=No, Resistance=24.9kR, RoHS=Yes, Stock 1=67196, Supplier 1=Digi-Key, Width=0.02inch
R19 R23 R25 R26 R683: library part Resistor, Case/Package=0402, Case Code (Metric)=1005, Manufacturer 1=Yageo, Manufacturer Part Number 1=RC0402FR-074K87L, Max Operating Temperature=155°C, Max Power Dissipation=63mW, Min Operating Temperature=-55°C, Power Rating=62.5mW, Supplier Part Number 1=YAG3175CT-ND, Temperature Coefficient=100ppm/°C, Tolerance=1%, Voltage Rating=50V, Case Code (Imperial)=0402, ComponentLink1Description=https://datasheet.ciiva.com/16867/pyu-rc0402-51-rohs-l-6-16867671.pdf?src-supplier=Avnet+Europe, ComponentLink1URL=https://datasheet.ciiva.com/16867/pyu-rc0402-51-rohs-l-6-16867671.pdf?src-supplier=Avnet+Europe, ComponentLink2Description=https://datasheet.ciiva.com/17013/pyu-rc0402-51-rohs-l-6-r-17013831.pdf?src-supplier=Future+Electronics, ComponentLink2URL=https://datasheet.ciiva.com/17013/pyu-rc0402-51-rohs-l-6-r-17013831.pdf?src-supplier=Future+Electronics, ComponentLink3Description=https://datasheet.ciiva.com/8892/pyu-rc0402-51-rohs-l-6-8892856.pdf?src-supplier=Avnet, ComponentLink3URL=https://datasheet.ciiva.com/8892/pyu-rc0402-51-rohs-l-6-8892856.pdf?src-supplier=Avnet, ComponentLink4Description=https://datasheet.ciiva.com/28409/pyu-rc0402-51-rohs-l-6-28409851.pdf?src-supplier=Avnet+Europe, ComponentLink4URL=https://datasheet.ciiva.com/28409/pyu-rc0402-51-rohs-l-6-28409851.pdf?src-supplier=Avnet+Europe, Composition="Thick Film", Contact Plating=Tin,Matte,Lead, Depth=0.5mm, Features="Moisture Resistant", Height=0.016inch, Lead Free="Lead Free", Length=1mm, Military Standard=Not, Number of Terminations=2, Packaging="Tape and Reel", Pricing 1="1=0,10000, 10=0,01600, 100=0,00640, 1000=0,00289, 2500=0,00251, 5000=0,00207 (USD)", Radiation Hardening=No, Resistance=4.87kR, RoHS=Yes, Stock 1=130432, Supplier 1=Digi-Key, Termination=SMD/SMT, Voltage Rating (DC)=50V, Width=0.5mm
R27 R28 R182 R191 R200 R209 R228 R269: library part Resistor, Case/Package=0402, Case Code (Metric)=1005, Manufacturer=Panasonic, Manufacturer Part Number=ERJ-2RKF1021X, Max Operating Temperature=155°C, Max Power Dissipation=100mW, Min Operating Temperature=-55°C, Package Quantity=1, Supplier Part Number 1=P1.02KLCT-ND, Temperature Coefficient=100ppm/°C, Tolerance=1%, Voltage Rating=50V, Case Code (Imperial)=0402, ComponentLink1Description=https://datasheet.ciiva.com/16760/70260748-16760677.pdf?src-supplier=Allied+Electronics, ComponentLink1URL=https://datasheet.ciiva.com/16760/70260748-16760677.pdf?src-supplier=Allied+Electronics, ComponentLink2Description=https://datasheet.ciiva.com/24026/aoa0000ce2-24026598.pdf?src-supplier=Mouser, ComponentLink2URL=https://datasheet.ciiva.com/24026/aoa0000ce2-24026598.pdf?src-supplier=Mouser, ComponentLink3Description=https://datasheet.ciiva.com/22743/1678782-22743480.pdf?src-supplier=Farnell, ComponentLink3URL=https://datasheet.ciiva.com/22743/1678782-22743480.pdf?src-supplier=Farnell, ComponentLink4Description=https://datasheet.ciiva.com/16778/70260748-16778748.pdf?src-supplier=Allied+Electronics, ComponentLink4URL=https://datasheet.ciiva.com/16778/70260748-16778748.pdf?src-supplier=Allied+Electronics, ComponentLink5Description=https://datasheet.ciiva.com/22682/1678782-22682413.pdf?src-supplier=Element14, ComponentLink5URL=https://datasheet.ciiva.com/22682/1678782-22682413.pdf?src-supplier=Element14, ComponentLink6Description=https://datasheet.ciiva.com/46373/1678782-46373838.pdf?src-supplier=Element14, ComponentLink6URL=https://datasheet.ciiva.com/46373/1678782-46373838.pdf?src-supplier=Element14, ComponentLink7Description=https://datasheet.ciiva.com/46373/1678782-46373839.pdf?src-supplier=Element14, ComponentLink7URL=https://datasheet.ciiva.com/46373/1678782-46373839.pdf?src-supplier=Element14, Composition="Thick Film", Contact Plating=Tin, Depth=0.5mm, Features="Automotive AEC-Q200", Height=0.35mm, Lead Free="Lead Free", Length=1mm, Military Standard=Not, Mount="Surface Mount", Number of Terminations=2, Packaging="Tape and Reel", Power Rating=100mW, Pricing 1="1 = 0,10000, 10 = 0,04300, 100 = 0,01750, 1000 = 0,00787, 2500 = 0,00683, 5000 = 0,00564 (USD)", REACH SVHC="No SVHC", Resistance=1.02kR, RoHS=Yes, Stock 1=88589, Supplier 1=Digi-Key, Termination=SMD/SMT, Voltage Rating (DC)=50V, Width=0.02inch
R31 R32 R33 R34 R35 R36 R37 R38 R39 R40 R41 R42 R43 R44 R45 R46 R47 R48 R49 R50 R51 R53 R55 R57 R59: library part Resistor, Case/Package=0402, Case Code (Metric)=1005, Manufacturer=Panasonic, Manufacturer Part Number=ERJ-2RKF39R2X, Max Operating Temperature=155°C, Max Power Dissipation=100mW, Min Operating Temperature=-55°C, Package Quantity=1, Supplier Part Number 1=P39.2LCT-ND, Temperature Coefficient=100ppm/°C, Tolerance=1%, Voltage Rating=50V, Case Code (Imperial)=0402, ComponentLink1Description=https://datasheet.ciiva.com/7943/aoa0000ce2-7943669.pdf?src-supplier=Element14, ComponentLink1URL=https://datasheet.ciiva.com/7943/aoa0000ce2-7943669.pdf?src-supplier=Element14, ComponentLink2Description=https://datasheet.ciiva.com/22667/1678782-22667733.pdf?src-supplier=Element14, ComponentLink2URL=https://datasheet.ciiva.com/22667/1678782-22667733.pdf?src-supplier=Element14, ComponentLink3Description=https://datasheet.ciiva.com/16760/70260748-16760342.pdf?src-supplier=Allied+Electronics, ComponentLink3URL=https://datasheet.ciiva.com/16760/70260748-16760342.pdf?src-supplier=Allied+Electronics, ComponentLink4Description=https://datasheet.ciiva.com/9189/aoa0000ce2-9189912.pdf?src-supplier=Avnet, ComponentLink4URL=https://datasheet.ciiva.com/9189/aoa0000ce2-9189912.pdf?src-supplier=Avnet, ComponentLink5Description=https://datasheet.ciiva.com/16773/70260748-16773948.pdf?src-supplier=Allied+Electronics, ComponentLink5URL=https://datasheet.ciiva.com/16773/70260748-16773948.pdf?src-supplier=Allied+Electronics, ComponentLink6Description=https://datasheet.ciiva.com/24068/aoa0000ce2-24068813.pdf?src-supplier=Mouser, ComponentLink6URL=https://datasheet.ciiva.com/24068/aoa0000ce2-24068813.pdf?src-supplier=Mouser, ComponentLink7Description=https://datasheet.ciiva.com/43467/1678782-43467181.pdf?src-supplier=Farnell, ComponentLink7URL=https://datasheet.ciiva.com/43467/1678782-43467181.pdf?src-supplier=Farnell, ComponentLink8Description=https://datasheet.ciiva.com/46372/1678782-46372671.pdf?src-supplier=Element14, ComponentLink8URL=https://datasheet.ciiva.com/46372/1678782-46372671.pdf?src-supplier=Element14, Composition="Thick Film", Contact Plating=Tin, Depth=0.5mm, Features="Automotive AEC-Q200", Height=0.35mm, Lead Free="Lead Free", Length=1mm, Military Standard=Not, Mount="Surface Mount", Number of Terminations=2, Packaging="Tape and Reel", Power Rating=100mW, Pricing 1="1 = 0,10000, 10 = 0,04500, 100 = 0,01830, 1000 = 0,00823, 2500 = 0,00715, 5000 = 0,00590 (USD)", Radiation Hardening=No, REACH SVHC="No SVHC", Resistance=39.2R, RoHS=Yes, Stock 1=158875, Supplier 1=Digi-Key, Termination=SMD/SMT, Voltage Rating (DC)=50V, Width=0.02inch
R52 R54: library part Resistor, Case/Package=0402, Case Code (Metric)=1005, Manufacturer=Panasonic, Manufacturer Part Number=ERJ-2RKF36R0X, Max Operating Temperature=155°C, Max Power Dissipation=100mW, Min Operating Temperature=-55°C, Package Quantity=10000, Supplier Part Number 1=P36.0LCT-ND, Temperature Coefficient=100ppm/°C, Tolerance=1%, Voltage Rating=50V, Case Code (Imperial)=0402, ComponentLink1Description=https://datasheet.ciiva.com/11821/0900766b80f80784-11821284.pdf?src-supplier=RSComponents, ComponentLink1URL=https://datasheet.ciiva.com/11821/0900766b80f80784-11821284.pdf?src-supplier=RSComponents, ComponentLink2Description=https://datasheet.ciiva.com/46372/1678782-46372805.pdf?src-supplier=Element14, ComponentLink2URL=https://datasheet.ciiva.com/46372/1678782-46372805.pdf?src-supplier=Element14, ComponentLink3Description=https://datasheet.ciiva.com/24027/aoa0000ce2-24027143.pdf?src-supplier=Mouser, ComponentLink3URL=https://datasheet.ciiva.com/24027/aoa0000ce2-24027143.pdf?src-supplier=Mouser, ComponentLink4Description=https://datasheet.ciiva.com/22667/1678782-22667977.pdf?src-supplier=Element14, ComponentLink4URL=https://datasheet.ciiva.com/22667/1678782-22667977.pdf?src-supplier=Element14, ComponentLink5Description=https://datasheet.ciiva.com/43467/1678782-43467177.pdf?src-supplier=Farnell, ComponentLink5URL=https://datasheet.ciiva.com/43467/1678782-43467177.pdf?src-supplier=Farnell, ComponentLink6Description=https://datasheet.ciiva.com/9190/aoa0000ce2-9190202.pdf?src-supplier=Avnet, ComponentLink6URL=https://datasheet.ciiva.com/9190/aoa0000ce2-9190202.pdf?src-supplier=Avnet, ComponentLink7Description=https://datasheet.ciiva.com/22721/1678782-22721246.pdf?src-supplier=Farnell, ComponentLink7URL=https://datasheet.ciiva.com/22721/1678782-22721246.pdf?src-supplier=Farnell, Composition="Thick Film", Contact Plating=Tin, Depth=0.5mm, Height=0.35mm, Length=1mm, Mount="Surface Mount", Number of Terminations=2, Packaging="Tape and Reel", Power Rating=100mW, Pricing 1="1 = 0,10000, 10 = 0,05300, 100 = 0,02170, 1000 = 0,00973, 2500 = 0,00844, 5000 = 0,00698 (USD)", REACH SVHC="No SVHC", Resistance=36R, RoHS=Yes, Stock 1=324893, Supplier 1=Digi-Key, Termination=SMD/SMT, Voltage Rating (DC)=50V, Width=0.02inch
R56: library part Resistor, Case/Package=0402, Case Code (Metric)=1005, Manufacturer=Yageo, Manufacturer Part Number=RC0402FR-07499RL, Max Operating Temperature=155°C, Max Power Dissipation=63mW, Min Operating Temperature=-55°C, Package Quantity=1, Power Rating=62.5mW, Supplier Part Number 1=311-499LRCT-ND, Temperature Coefficient=100ppm/°C, Tolerance=1%, Voltage Rating=50V, Case Code (Imperial)=0402, ComponentLink1Description=https://datasheet.ciiva.com/2453/pyu-r-int-thick-7-2453538.pdf?src-supplier=Digi-Key, ComponentLink1URL=https://datasheet.ciiva.com/2453/pyu-r-int-thick-7-2453538.pdf?src-supplier=Digi-Key, ComponentLink2Description=https://datasheet.ciiva.com/2453/pyu-r-int-thick-7-2453539.pdf?src-supplier=Digi-Key, ComponentLink2URL=https://datasheet.ciiva.com/2453/pyu-r-int-thick-7-2453539.pdf?src-supplier=Digi-Key, ComponentLink3Description=https://datasheet.ciiva.com/2453/pyu-r-int-thick-7-2453540.pdf?src-supplier=Digi-Key, ComponentLink3URL=https://datasheet.ciiva.com/2453/pyu-r-int-thick-7-2453540.pdf?src-supplier=Digi-Key, Composition="Thick Film", Depth=0.5mm, Features="Moisture Resistant", Height=0.016inch, Lead Free="Lead Free", Length=1mm, Military Standard=Not, Number of Terminations=2, Packaging="Tape and Reel", Pricing 1="1 = 0,10000, 10 = 0,01600, 100 = 0,00640, 1000 = 0,00289, 2500 = 0,00251, 5000 = 0,00207 (USD)", REACH SVHC="No SVHC", Resistance=499R, RoHS=Yes, Stock 1=957165, Supplier 1=Digi-Key, Termination=SMD/SMT, Voltage Rating (DC)=50V, Width=0.02inch